# Altium PCB Zulu_a7_no_pmod.PcbDoc (part 4 of 5)
Units mm, origin at the board's own origin, x right, y up, seen from the top; angles counter-clockwise.
Board outline 60.96 x 25.4 mm, 6 copper layers (Top Layer, L2-GND, L3-SIG, L4-SIG, L5-VCC3V3, Bottom Layer), stack 1.65 mm thick; 195 components, 183 nets, 874 pads, 1992 vias.
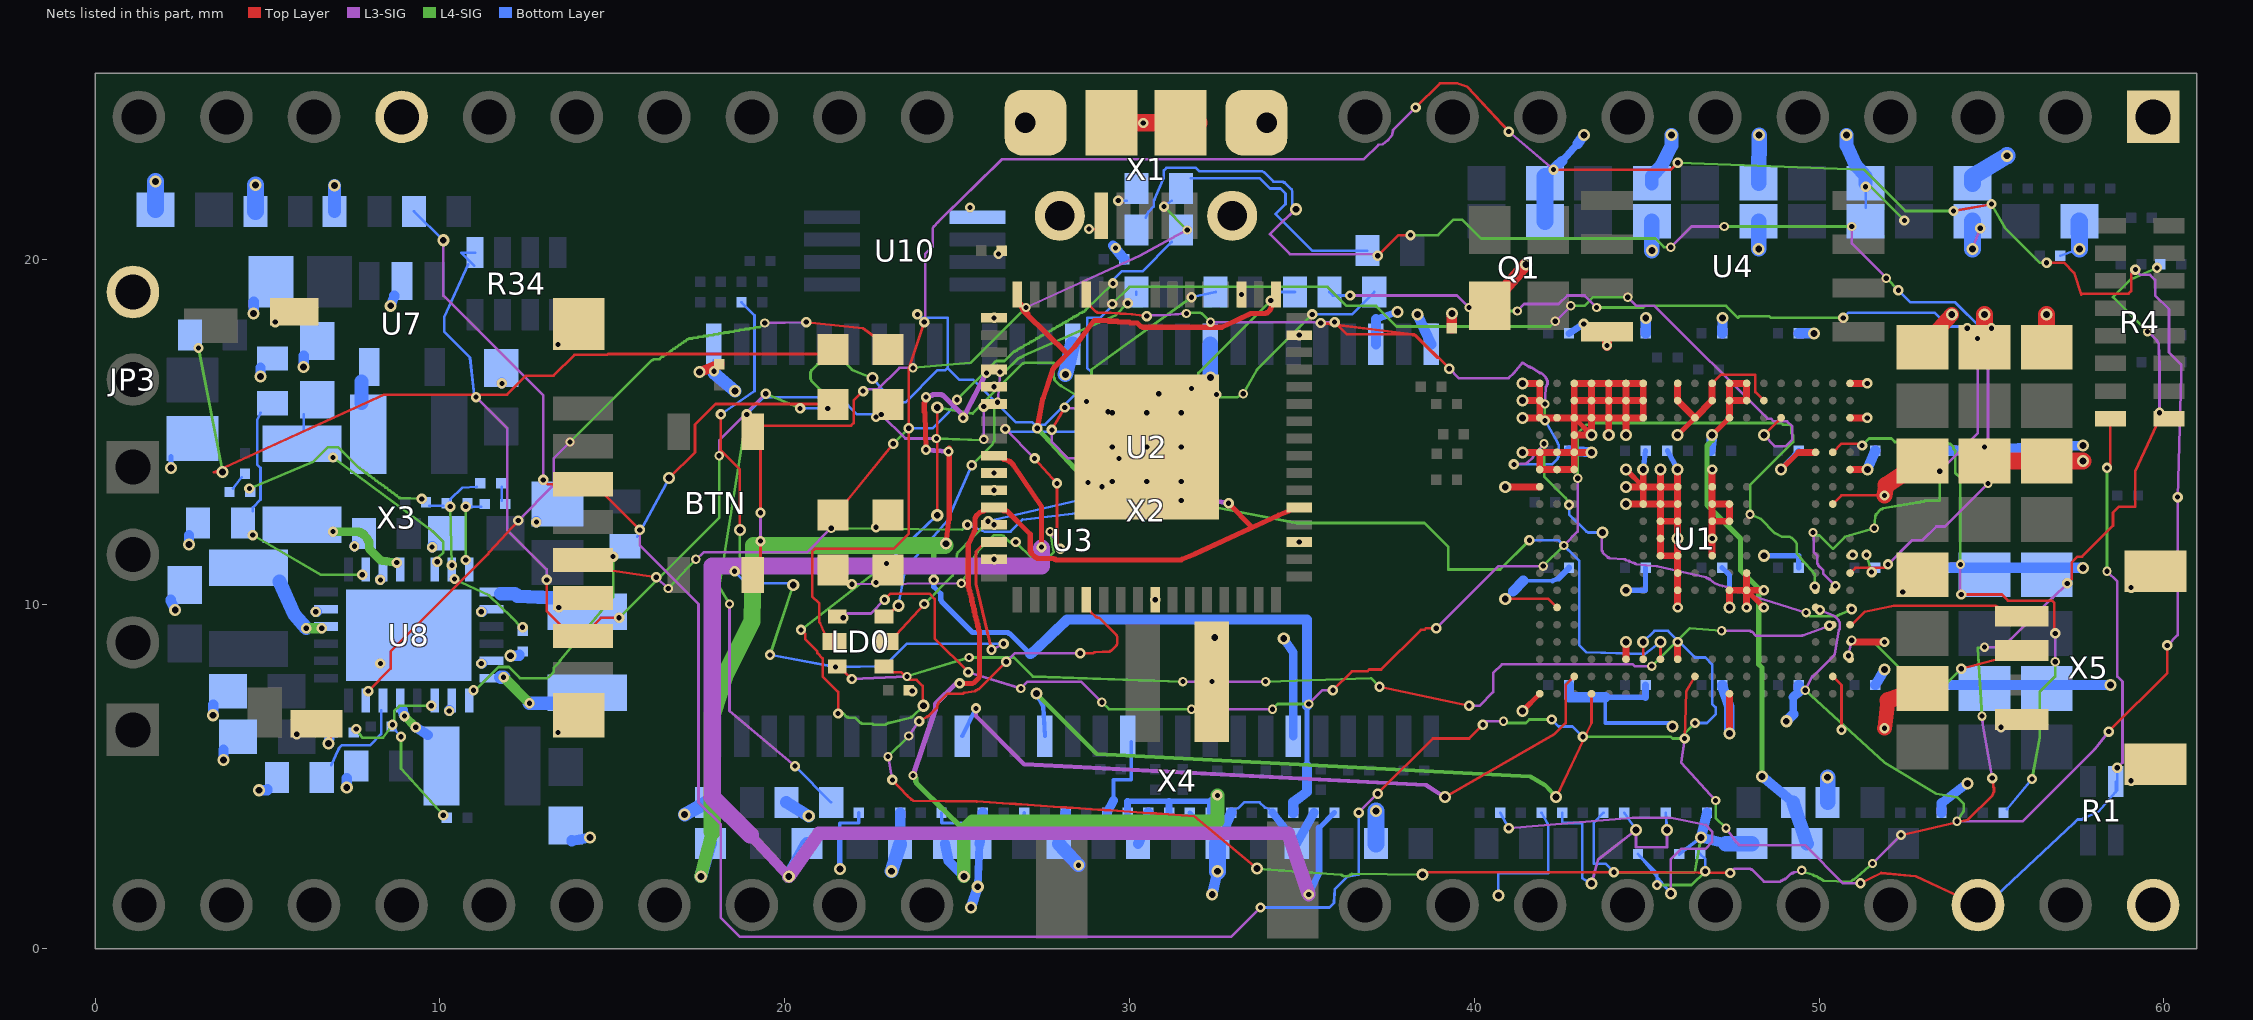
[diagram p7: the nets of this part, all layers, seen from the top]

## Via types
v1: diameter 0.27, hole 0.15, L3-SIG to L4-SIG, tented both sides, 402 vias
v2: diameter 0.3, hole 0.15, Top Layer to L2-GND, tented both sides, 351 vias
v3: diameter 0.3, hole 0.15, L5-VCC3V3 to Bottom Layer, tented both sides, 317 vias
v4: diameter 0.35, hole 0.2, Top Layer to Bottom Layer, tented both sides, 315 vias
v5: diameter 0.3, hole 0.15, L2-GND to L3-SIG, tented both sides, 311 vias
v6: diameter 0.3, hole 0.15, L4-SIG to L5-VCC3V3, tented both sides, 296 vias

## Nets (pads, with @x,y where several pads share a name; then routed paths per layer and width w, separated by ;. In a path a pad name is that pad's centre, name@x,y a point inside that pad or via, vN(x,y) a via of type N, cw(c..) or ccw(c..) an arc to the next point about the centre after c; other vN are vias at no path point) (continued)
FT-PWREN#: U1.P19 U2.60 | length 35
  Top Layer w0.076: U2.60@28.85,18.7 28.875,18.625 29.025,18.475 29.05,18.475 29.075,18.45 29.45,18.45 29.725,18.425 30.075,18.4 30.3,18.375 v2(30.5,18.35) ; v2(35.55,18.15) 38.2,17.825 38.225,17.8 38.25,17.8 38.3,17.775 38.925,17.15 ; v2(35.95,18.175) 36.3,17.825 38.25,17.825 38.275,17.8 38.3,17.8 v2(39.275,16.825)
  L3-SIG w0.076: v2(30.5,18.35) 30.55,18.375 30.975,18.375 v1(31.65,18.425) ; v1(32.35,18.175) v2(35.95,18.175) ; v2(39.275,16.825) 39.55,16.55 41,16.55 41.15,16.7 41.4,17 41.525,16.925 41.55,16.9 41.575,16.9 41.6,16.875 41.625,16.875 41.65,16.85 41.675,16.85 41.875,16.725 41.9,16.7 41.925,16.7 41.975,16.675 42.075,16.575 42.075,16.55 42.1,16.525 42.1,16.5 42.125,16.475 42.125,16.375 42.1,16.35 42.1,16.325 42.075,16.3 42.075,16.275 v1(42.05,15.8) ; v1(41.15,14.05) 41.5,14.075 41.525,14.1 41.55,14.1 41.7,14.25 41.725,14.3 v1(42.025,14.65) ; v4(43.725,12.075) 43.7,12.05 43.7,11.55 43.725,11.525 43.725,11.5 43.875,11.35 43.9,11.35 43.925,11.325 44.35,11.3 44.375,11.3 44.4,11.275 44.475,11.25 44.5,11.25 44.525,11.225 44.6,11.2 44.625,11.2 44.65,11.175 44.675,11.175 44.7,11.15 44.975,11.125 45.3,11.1 46.725,10.775 46.75,10.75 46.775,10.75 46.8,10.725 46.825,10.725 46.975,10.6 47.05,10.575 47.125,10.55 47.2,10.525 47.3,10.5 47.375,10.475 47.45,10.45 47.525,10.425 47.55,10.4 47.575,10.4 47.6,10.375 47.625,10.375 47.65,10.35 47.675,10.35 v1(49.625,9.75)
  L4-SIG w0.076: v1(31.65,18.425) 31.675,18.45 32.05,18.45 32.1,18.425 v1(32.35,18.175) ; v1(42.025,14.65) 42.025,13.7 42.65,13.075 v6(42.75,12.875) ; v6(42.05,15.325) v1(42.05,15.8) ; v1(49.625,9.75) 49.725,9.65 50.525,9.65 50.55,9.675 50.575,9.675 50.6,9.7 50.625,9.7 v2(50.95,9.85)
  Bottom Layer w0.076: v1(41.15,14.05) 42.25,14.05 42.425,14.225 42.425,14.25 42.45,14.275 42.45,14.625 42.425,14.65 42.425,14.675 v6(42.05,15.325) ; v6(42.75,12.875) 42.75,12.6 43.25,12.1 43.275,12.1 43.3,12.075 v4(43.725,12.075)
  other v1: 50.95,9.85
  other v3: 42.75,12.875 41.15,14.05 42.05,15.325
  other v5: 50.95,9.85 39.275,16.825 35.55,18.15 35.95,18.175 30.5,18.35
  other v6: 41.15,14.05
FT-REF: R18.2 U2.6 | length 21.3
  L3-SIG w0.076: v1(18.4,10) 18.4,6.9 v1(20.3,5.3) ; v1(22.8,15.5) 23.5,14.8 v1(24.4,14.8) ; v1(25.775,14.775) v2(25.775,15.725)
  L4-SIG w0.076: v1(18.4,10) 18.1,10.5 v6(18.9,15.5) ; v1(24.4,14.8) 25.775,14.75 v1(25.775,14.775)
  Bottom Layer w0.076: v6(18.9,15.5) 19.4,16 21.6,16 22.1,15.5 v1(22.8,15.5) ; v1(20.3,5.3) R18.2@21.35,4.25
  other v3: 20.3,5.3 18.9,15.5 22.8,15.5
  other v5: 25.775,15.725
  other v6: 20.3,5.3 22.8,15.5
FT-RESETN: R19.1 U2.14 | length 23.6
  Top Layer w0.076: v2(18.15,15.5) 18.15,14.45 18.7,13.9 v4(18.7,12.15) ; v4@20.15,10.6 20.15,10.55 v4(20.25,10.55) ; U2.14@25.775,11.7 25.7,11.675 25.55,11.525 25.55,10.575 v2(26,8.675)
  L3-SIG w0.076: v2(26,8.675) v1(26.35,8.85)
  L4-SIG w0.076: v6(18.55,10.95) 18.7,11.1 v4(18.7,12.15) ; v6(19.575,8.525) v4(20.25,10.55)
  Bottom Layer w0.076: v2(18.15,15.5) 19.125,16.175 19.125,18.375 R19.1@18.75,18.75 ; v6(18.55,10.95) 18.9,10.6 20.15,10.6 v4(20.25,10.55) ; v6(19.575,8.525) v3(21.475,8.175) 22.9,8.2 23.55,8.85 v1(26.35,8.85)
  other v1: 18.15,15.5
  other v3: 19.575,8.525 26.35,8.85 18.55,10.95 18.15,15.5
  other v5: 26,8.675 18.15,15.5
  other v6: 26.35,8.85 18.15,15.5
FT-VCORE: C139.2 C152.2 C153.2 C154.2 U2.12 U2.37 U2.49 U2.64 | length 53.6
  Top Layer w0.15: v2(25.075,7.7) 25.45,7.7 25.5,7.725 25.625,7.85 25.65,7.9 25.65,9.225 25.625,9.25 25.625,9.325 25.6,9.35 25.6,9.425 25.575,9.45 25.575,9.525 25.55,9.55 25.55,9.625 25.525,9.65 25.525,9.75 25.5,9.775 25.5,9.85 25.475,9.875 25.475,9.95 25.45,9.975 25.45,10.05 25.425,10.075 25.425,10.175 25.4,10.2 25.4,10.275 25.375,10.3 25.375,10.375 25.35,10.4 25.35,10.475 25.325,10.5 25.325,11.725 25.5,12.1 25.525,12.125 25.525,12.5 25.55,12.525 25.55,12.55 25.65,12.65 U2.12@25.775,12.7 ; U2.12@26.35,12.7 26.45,12.7 27.125,12.025 27.125,11.525 27.15,11.5 27.15,11.475 27.275,11.35 27.3,11.35 27.325,11.325 27.8,11.325 27.825,11.3 27.85,11.3 27.875,11.275 31.5,11.275 31.525,11.3 31.9,11.45 34.325,12.575 U2.37@34.625,12.7 ; U2.64@26.85,18.7 26.875,18.6 26.95,18.525 26.95,18.5 27,18.45 27.025,18.45 27.05,18.425 ; 26.9,18.55 26.925,18.5 27,18.425 28.2,17.25 ; v1(27.325,15.1) 27.475,15.925 27.475,15.95 27.5,15.975 27.75,16.725 27.775,16.8 27.8,16.825 27.8,16.85 28.4,17.45 28.975,18.225 29.375,18.225 29.4,18.2 29.65,18.2 29.675,18.175 30,18.175 30.025,18.15 30.225,18.15 30.325,18.05 30.35,18.05 30.375,18.025 32.675,18.025 33.525,18.425 33.95,18.425 33.975,18.45 34,18.45 34.075,18.525 U2.49@34.15,18.7 ; v2(32.875,12.925) 33.55,12.225
  L3-SIG w0.15: v1(23.725,5.025) 24.35,6.875 24.35,6.9 24.375,6.925 24.375,7.1 24.975,7.7 v2(25.075,7.7) ; v1(28.8,13.525) v2(32.875,12.925)
  L4-SIG w0.15: v1(23.725,5.025) 23.8,4.95 23.8,4.85 23.825,4.825 23.825,4.8 23.95,4.675 25.2,3.45 ; v1(27.325,15.1) v1(28.8,13.525)
  L4-SIG w0.39: v4(25.2,2.1) 25.2,3.45
  L4-SIG w0.4: 25.2,3.45 25.45,3.7 32.55,3.7 v6(32.55,4.45)
  Bottom Layer w0.16: 29.949,4.28 32.349,4.28
  Bottom Layer w0.2: C152.2@29.949,3.95 29.949,4.28 ; C153.2@31.149,3.95 31.149,4.28 ; C154.2@32.349,3.95 32.349,4.28 v6(32.55,4.45)
  Bottom Layer w0.29: 24.75,2.55 v4(25.2,2.1)
  Bottom Layer w0.3: C139.2@24.65,3.05 24.75,2.55
  other v2: 27.325,15.1
  other v3: 32.55,4.45
  other v5: 25.075,7.7 32.875,12.925 27.325,15.1
FT-VPHY: C40.2 L4.1 U2.4 | length 43.5
  Top Layer w0.15: v2(24.1,14.475) 24.075,15.525 24.075,15.55 24.05,15.575 24.05,15.825 24.075,15.85 24.075,15.875 v2(24.1,16) ; v4(24.675,11.75) 24.75,12.4 24.75,12.425 24.775,12.45 v2@24.775,14.525 ; v2(24.75,14.425) v2@24.775,14.425
  L3-SIG w0.15: v2(24.1,14.475) 24.325,14.45 v2(24.75,14.425) ; v2(24.1,16) 24.25,16.05 24.275,16.05 24.3,16.075 24.55,16.075 24.575,16.05 24.6,16.05 25.175,15.475 v5@25.2,15.475 ; v5(25.175,15.4) v2(25.85,16.7)
  L4-SIG w0.15: v6(24.325,10.7) 24.325,11.7 ; v4@24.65,11.7 24.675,11.725 v4(24.675,11.75)
  L4-SIG w0.37: v4(17.57,2.1) 17.9,3.4
  L4-SIG w0.5: 17.9,3.4 17.9,6.8 18.3,8 19.05,9.5 19.1,11.7 v4@24.65,11.7
  Bottom Layer w0.15: v6(24.325,10.7) 24.325,10.5 24.525,10.3 24.525,10.125 24.55,10.1 24.55,10.075 25.45,9.175 26.475,9.175 26.5,9.15 26.525,9.15 27.125,8.55 ; 35.15,5.3 35.15,7.05
  Bottom Layer w0.3: 27.125,8.55 27.2,8.6 28.2,9.55 35.15,9.55 35.15,7.05 ; C40.2@34.749,3.95 34.749,4.25 35.15,4.55 35.15,5.3
  Bottom Layer w0.37: v4(17.57,2.1) L4.1@17.85,3.05
  other v3: 24.325,10.7
  other v5: 24.75,14.425 24.1,14.475 24.1,16 25.85,16.7
FT-VPLL: C41.2 L5.1 U2.9 | length 43.7
  Top Layer w0.15: U2.9@26.35,14.2 26.5,14.15 26.525,14.125 26.55,14.125 26.625,14.05 26.65,14 27.45,12.825 v2(27.45,11.65)
  L3-SIG w0.15: v5@27.45,11.625 v2(27.45,11.65)
  L3-SIG w0.3: 19,3.3 v4(20.12,2.1)
  L3-SIG w0.39: v4(20.12,2.1) 21,3.35
  L3-SIG w0.4: 21,3.35 34.6,3.35 v1(35.2,1.575)
  L3-SIG w0.5: 19,3.3 17.9,4.4 17.9,7.4 17.9,11.1 27.45,11.1 v5@27.45,11.625
  Bottom Layer w0.15: 35.5,3.5 C41.2@35.949,3.95
  Bottom Layer w0.2: v1(35.2,1.575) 35.5,2.2 35.5,3.5
  Bottom Layer w0.39: v4(20.12,2.1) L5.1@20.65,3.05
  other v3: 35.2,1.575
  other v5: 27.45,11.65
  other v6: 35.2,1.575
GND: C3.1 C4.1 C5.1 C6.1 C7.1 C8.1 C9.1 C11.1 C12.1 C13.1 C38.1 C40.1 C41.1 C78.1 C80.1 C82.1 C84.1 C85.2 C86.2 C87.2 C88.2 C89.2 C90.2 C91.2 C92.2 C93.2 C94.2 C95.2 C96.2 C97.2 C98.2 C99.2 C100.2 C101.2 C102.2 C103.2 C104.2 C105.2 C106.2 C107.2 C108.2 C109.2 C110.2 C111.2 C112.2 C113.2 C114.2 C115.2 C116.2 C117.2 C118.2 C119.2 C120.2 C121.2 C122.2 C133.1 C134.1 C135.1 C136.1 C137.1 C138.1 C139.1 C140.2 C141.2 C142.2 C143.2 C144.2 C145.2 C146.2 C147.1 C148.1 C149.1 C150.1 C151.1 C152.1 C153.1 C154.1 C155.1 C156.1 C157.1 C158.1 C159.1 C160.1 C161.1 C167.1 C168.1 JP3.3 L6.1 LD1.K LD2.K LD3.K Q1.2 R5.1 R11.1 R13.2 R15.1 R17.2 R18.1 R21.1 R22.1 R86.1 R102.2 R103.2 R114.2 R116.2 U1.A1 U1.A3 U1.A4 U1.A5 U1.A6 U1.A7 U1.A9 U1.A11 U1.A19 U1.B1 U1.B3 U1.B4 U1.B5 U1.B6 U1.B7 U1.B9 U1.B11 U1.B14 U1.C1 U1.C2 U1.C3 U1.C4 U1.C5 U1.C6 U1.C7 U1.C10 U1.C19 U1.D3 U1.E1 U1.E2 U1.E3 U1.E17 U1.F1 U1.F2 U1.F3 U1.F19 U1.G1 U1.G7 U1.G8 U1.G9 U1.G11 U1.H7 U1.H8 U1.H9 U1.H11 U1.H12 U1.H18 U1.J8 U1.J9 U1.J11 U1.J12 U1.K8 U1.L8 U1.L9 U1.L11 U1.L19 U1.M9 U1.M13 U1.N9 U1.N12 U1.N13 U1.P2 U1.T19 U1.U6 U1.U9 U1.V18 U1.W1 U1.W12 U2.1 U2.5 U2.10 U2.11 U2.13 U2.15 U2.25 U2.35 U2.47 U2.51 U2.EP U3.6 U3.12 U3.28 U3.41 U3.46 U3.52 U3.54 U4.4 U7.2 U8.3 U8.10 U8.13 U8.16 U8.27 U8.29 U10.5 X1.5 X1.MH1 X1.MH2 X1.MP1 X1.MP2 X1.MP3 X1.MP4 X1.MS1 X1.MS2 X2.1 X2.17 X2.21 X3.6 X3.G1 X3.G2 X3.G3 X3.G4 X4.2 X5.1 X5.MP1 X5.MP2 | length 182.2
  Top Layer w0.076: v2(28.825,20.875) X1.5@29.025,20.875 ; v4(40.9,10.15) 42.15,10.15 U1.P2@42.4,9.9 ; U1.A11@46.9,16.4 47.15,16.65 48.15,16.65 48.15,16.15 U1.B14@48.4,15.9 ; U1.V18@50.4,7.9 50.65,7.65 v2(50.65,6.35) ; U1.H18@50.4,12.9 50.65,13.15 v2(51.9,13.15)
  Top Layer w0.15: v4(6.775,5.95) X3.G2@6.8,6.15 ; v4(41.4,6.9) U1.W1@41.9,7.4 ; U1.C3@42.9,15.4 v4(43.4,14.9) ; v4(44.4,13.9) U1.G7@44.9,13.4 ; v4(45.9,14.9) U1.C10@46.4,15.4 ; U1.N13@47.9,10.4 v2(48.4,9.9) ; v4(48.9,13.9) 49.4,14.4
  Top Layer w0.2: v4(40.9,13.4) U1.G1@41.9,13.4 ; v4(41.4,14.4) U1.E1@41.9,14.4 ; v4(41.4,15.4) U1.C1@41.9,15.4 ; v4(41.4,15.9) U1.B1@41.9,15.9 ; v4(41.4,16.4) U1.A1@41.9,16.4 U1.B1@41.9,15.9 ; v4(43.4,14.4) U1.E3@42.9,14.4 ; v4(43.9,14.9) U1.C5@43.9,15.4 ; U1.U6@44.4,8.4 v4(44.4,8.9) ; v4(44.4,12.9) U1.H7@44.9,12.9 ; v4(44.4,13.4) U1.G7@44.9,13.4 ; v4(44.4,14.9) U1.C6@44.4,15.4 ; v4(44.9,13.9) U1.G7@44.9,13.4 ; v4(45.4,13.9) U1.G8@45.4,13.4 ; U1.U9@45.9,8.4 v2(45.9,8.9) ; v2(45.9,9.9) U1.N9@45.9,10.4 U1.M9@45.9,10.9 U1.L9@45.9,11.4 ; v4(45.9,13.9) U1.G9@45.9,13.4 ; U1.A9@45.9,16.4 U1.B9@45.9,15.9 U1.C10@46.4,15.4 U1.B11@46.9,15.9 U1.A11@46.9,16.4 ; U1.L11@46.9,11.4 v2(46.9,11.9) U1.J11@46.9,12.4 ; v2(46.9,13.9) U1.G11@46.9,13.4 U1.H11@46.9,12.9 ; v4(47.4,6.25) U1.W12@47.4,7.4 ; v4(47.4,9.9) U1.N12@47.4,10.4 U1.N13@47.9,10.4 ; v2(47.9,9.9) U1.N13@47.9,10.4 ; U1.M13@47.9,10.9 U1.N13@47.9,10.4 ; v2(48.4,10.4) U1.N13@47.9,10.4 ; 49.4,14.4 U1.E17@49.9,14.4 ; U1.T19@50.9,8.9 v2(51.9,8.9) ; U1.F19@50.9,13.9 v4(51.4,13.9) ; U1.C19@50.9,15.4 v2(51.4,15.4) ; U1.A19@50.9,16.4 v2(51.4,16.4) ; U1.E1@41.9,14.4 U1.F1@41.9,13.9 U1.F2@42.4,13.9 U1.F3@42.9,13.9 ; U1.E1@41.9,14.4 U1.E2@42.4,14.4 U1.E3@42.9,14.4 ; U1.C1@41.9,15.4 U1.C2@42.4,15.4 U1.C3@42.9,15.4 ; U1.C1@41.9,15.4 U1.B1@41.9,15.9 ; U1.F3@42.9,13.9 U1.E3@42.9,14.4 ; U1.F3@42.9,13.9 U1.E3@42.9,14.4 ; U1.E3@42.9,14.4 U1.D3@42.9,14.9 ; U1.D3@42.9,14.9 U1.C3@42.9,15.4 ; U1.D3@42.9,14.9 v4(43.4,14.9) U1.C4@43.4,15.4 ; U1.C3@42.9,15.4 U1.B3@42.9,15.9 ; U1.C3@42.9,15.4 U1.C4@43.4,15.4 ; U1.B3@42.9,15.9 U1.B4@43.4,15.9 ; U1.B3@42.9,15.9 U1.A3@42.9,16.4 U1.A4@43.4,16.4 ; U1.C4@43.4,15.4 U1.B4@43.4,15.9 ; U1.C4@43.4,15.4 U1.C5@43.9,15.4 ; U1.B4@43.4,15.9 U1.B5@43.9,15.9 ; U1.B4@43.4,15.9 U1.A4@43.4,16.4 ; U1.A4@43.4,16.4 U1.A5@43.9,16.4 ; U1.C5@43.9,15.4 U1.B5@43.9,15.9 ; U1.C5@43.9,15.4 U1.C6@44.4,15.4 ; U1.B5@43.9,15.9 U1.B6@44.4,15.9 ; U1.B5@43.9,15.9 U1.A5@43.9,16.4 ; U1.A5@43.9,16.4 U1.A6@44.4,16.4 ; U1.C6@44.4,15.4 U1.B6@44.4,15.9 ; U1.C6@44.4,15.4 U1.C7@44.9,15.4 ; U1.C6@44.4,15.4 U1.C7@44.9,15.4 ; U1.B6@44.4,15.9 U1.B7@44.9,15.9 ; U1.B6@44.4,15.9 U1.A6@44.4,16.4 ; U1.A6@44.4,16.4 U1.A7@44.9,16.4 U1.B7@44.9,15.9 ; U1.H7@44.9,12.9 U1.H8@45.4,12.9 ; U1.H7@44.9,12.9 U1.G7@44.9,13.4 ; U1.G7@44.9,13.4 U1.G8@45.4,13.4 ; U1.C7@44.9,15.4 U1.B7@44.9,15.9 ; U1.J8@45.4,12.4 U1.K8@45.4,11.9 U1.L8@45.4,11.4 U1.L9@45.9,11.4 ; U1.J8@45.4,12.4 U1.J9@45.9,12.4 ; U1.J8@45.4,12.4 U1.H8@45.4,12.9 ; U1.H8@45.4,12.9 U1.H9@45.9,12.9 ; U1.H8@45.4,12.9 U1.G8@45.4,13.4 ; U1.G8@45.4,13.4 U1.G9@45.9,13.4 ; U1.L9@45.9,11.4 v4(45.9,11.9) U1.J9@45.9,12.4 ; U1.J9@45.9,12.4 U1.H9@45.9,12.9 ; U1.H9@45.9,12.9 U1.G9@45.9,13.4 ; U1.J11@46.9,12.4 U1.J12@47.4,12.4 U1.H12@47.4,12.9 U1.H11@46.9,12.9 ; U1.J11@46.9,12.4 U1.H11@46.9,12.9
  Top Layer w0.3: v4(17.525,16.725) C158.1@18.1,16.95 ; C157.1@39.35,18 v4(39.35,18.425) ; v2@43.85,17.495 U4.4@43.85,17.895
  Top Layer w0.365: Q1.2@40.45,18.65 v4(41.5,19.85)
  Top Layer w0.425: v2(51.9,6.4) 52,7.2
  Top Layer w0.43: C93.2@53,17.449 v4(53.85,18.4)
  Top Layer w0.465: v2(51.9,13.15) 51.95,13.45
  Top Layer w0.5: X1.MP2@29.52,23.958 X1.MP3@32.02,23.958 ; v2(30.4,23.95) v2@30.4,23.958 ; 51.95,13.45 C146.2@53,14.149 ; 52,7.2 C140.2@53,7.55 ; C85.2@54.8,14.149 C86.2@56.6,14.149 v4(57.65,14.149) ; C97.2@54.8,17.449 v4(54.8,18.4) ; C98.2@56.6,17.449 v4(56.6,18.4)
  L3-SIG w0.076: v4(54.45,20.3) v2(54.675,20.9)
  L4-SIG w0.076: v6(44.05,2.22) 46.4,2.22 v4(46.575,3.225) ; v6(51.35,22.1) 51.5,22.1 v1(52.475,21.125) ; v1(51.375,11.425) v6(51.525,10.925)
  Bottom Layer w0.076: C78.1@2.2,14.275 C78.1@2.2,14.3 ; v6(17.95,16.75) U3.28@17.95,17.075 ; U10.5@25.375,21.375 v6(25.375,21.5) ; v5(29.675,21.7) R86.1@29.925,21.7 ; C38.1@33.05,4.05 33.15,4.075 33.325,4.25 33.775,4.25 33.925,4.1 C40.1@34.05,4.05 ; v4(40.7,1.55) 40.7,2.2 42.15,2.2 42.15,3.6 R13.2@41.95,3.95 ; R15.1@43.75,3.95 43.47,3.671 43.47,2.47 43.8,2.47 v6(44.05,2.22) ; C103.2@51.35,21.5 v6(51.35,22.1) ; v6(51.525,10.925) C111.2@51.525,10.95 ; R5.1@57,20.1 v4(57.55,20.3)
  Bottom Layer w0.1: 21.6,3.45 21.6,3.65 22.15,3.65 C133.1@22.15,3.95 ; C135.1@24.55,3.95 24.55,3.65 25.75,3.65 26.95,3.65 C137.1@26.95,3.95 ; C152.1@29.349,3.95 29.35,3.65 30.5,3.65 31.75,3.65 C154.1@31.749,3.95 ; 29.54,4.9 30.05,4.9 U3.12@30.05,6
  Bottom Layer w0.105: R11.1@45.95,2.75 v4(46.575,3.225)
  Bottom Layer w0.11: 41.425,10.675 42.275,10.675 ; 43.8,7.3 43.8,6.55 45.65,6.55 v4(45.75,6.45)
  Bottom Layer w0.115: 29.54,4.3 29.54,4.9
  Bottom Layer w0.13: C154.1@31.749,3.95 C6.1@32.55,3.05 ; v4(40.9,10.15) 41.125,10.375
  Bottom Layer w0.145: 42.275,10.675 42.45,10.75
  Bottom Layer w0.15: v4(2.2,13.95) C78.1@2.2,14.275 ; v4(21.6,2.316) 21.6,3.45 ; v4(44.4,10.4) 44.97,10.4 C90.2@44.97,11.05 ; v4(44.9,13.9) C96.2@44.97,14.45 ; C92.2@45.6,14.45 v4(45.9,13.9) ; C89.2@47.19,11.05 47.4,10.84 v4(47.4,9.9) ; v4(48.4,11.4) 49.41,11.4 C91.2@49.41,11.05 ; v4(48.9,13.9) C95.2@49.41,14.45
  Bottom Layer w0.16: 43.8,7.3 44.97,7.3
  Bottom Layer w0.18: 42.45,10.75 C108.2@42.75,11.05
  Bottom Layer w0.2: C120.2@42.75,17.85 v6(43.175,18.125)
  Bottom Layer w0.205: 37.15,18.26 v4(37.775,18.475)
  Bottom Layer w0.21: 42.55,22.85 43,23.35 ; 44.97,7.3 C109.2@44.97,7.65 ; 49.25,6.8 49.25,7.3
  Bottom Layer w0.23: v4(25.6,1.8) C3.1@25.65,3.05 ; C40.1@34.149,3.95 C7.1@34.85,3.05
  Bottom Layer w0.25: v4(34.475,9) 34.75,8.6 U3.6@34.75,6.17
  Bottom Layer w0.255: C152.1@29.349,3.95 29.54,4.3
  Bottom Layer w0.26: C7.1@34.85,3.05 C41.1@35.349,3.95
  Bottom Layer w0.265: 53.55,4.22 v4(54.3,4.8)
  Bottom Layer w0.28: 49.25,7.3 49.41,7.45
  Bottom Layer w0.29: v4(46.575,3.225) R17.2@46.75,3.95
  Bottom Layer w0.295: v4(46.575,3.225) 47.3,3.05
  Bottom Layer w0.3: C147.1@2.2,10.125 2.2,10.1 v4(2.325,9.825) ; v4(2.725,11.725) 2.725,11.975 R103.2@2.725,12 ; v4(3.425,6.775) 3.425,7.05 C150.1@3.425,7.075 ; v4(3.725,5.475) 3.725,5.75 C151.1@3.725,5.775 ; v4(4.6,18.425) 4.6,18.75 C149.1@4.6,18.775 ; v4(4.75,4.6) 5,4.6 R102.2@5,4.625 ; v4(4.8,16.6) 4.8,16.825 C161.1@4.8,16.85 ; v4(6.05,16.875) 6.05,17.175 C168.1@6.05,17.2 ; v5(6.4,9.775) U8.27@6.425,9.775 ; v4(6.775,5.95) 6.8,6.15 R114.2@6.8,6.175 ; v4(7.3,4.675) 7.3,4.925 C160.1@7.3,4.95 ; v5(7.525,11.675) C167.1@7.525,11.7 ; v5(8.275,10.7) U8.3@8.275,10.725 ; v4(8.575,18.65) 8.675,18.925 U7.2@8.675,18.95 ; v5(9.775,11.65) C148.1@9.775,11.675 ; v5(10.275,6.9) U8.16@10.275,6.925 ; v5(11.2,8.275) U8.13@11.225,8.275 ; v5(11.2,9.775) U8.10@11.225,9.775 ; v5(11.8,16.4) C84.1@11.8,16.425 ; v4(12.05,8.5) 12.3,8.5 R116.2@12.3,8.525 ; v5(12.8,12.375) C80.1@12.8,12.4 ; C82.1@13.825,3.15 13.825,3.125 v4(14.35,3.225) ; C139.1@23.35,3.05 C134.1@23.35,3.95 ; v4(25.4,1.2) v4(25.6,1.8) ; C3.1@25.65,3.05 25.75,3.65 C136.1@25.75,3.95 ; C4.1@27.95,3.05 C138.1@28.15,3.95 ; v3@29.525,20.4 C156.1@29.85,20 ; v3@29.592,20.318 v5(29.6,20.325) ; C5.1@30.25,3.05 30.5,3.65 C153.1@30.549,3.95 ; v4(32.4,1.575) v4(32.55,2.25) ; C6.1@32.55,3.05 C38.1@32.949,3.95 ; U3.52@37.15,17.53 37.15,18.26 ; v4(38.35,18.4) U3.54@38.75,17.53 ; 41.125,10.375 41.425,10.675 ; C106.2@42.05,22.2 42.05,22.4 42.55,22.85 ; C113.2@42.75,7.65 42.75,7.3 43.8,7.3 ; C112.2@42.75,14.45 v4(43.4,14.4) ; 43,23.35 v4(43.18,23.6) ; C117.2@44.97,17.85 v4(44.975,18.3) ; C107.2@47.19,7.65 47.4,7 v4(47.4,6.25) ; C116.2@47.19,17.85 v4(47.2,18.3) ; v4(49.05,6.6) 49.25,6.8 ; 49.41,7.45 C110.2@49.41,7.65 ; C118.2@49.41,17.85 v4(49.85,17.85) ; v4(51.4,13.9) C114.2@51.63,14.45 ; C115.2@51.63,7.65 v4(51.9,8.1) ; R22.1@53.55,3.95 53.55,4.22 ; C122.2@53.85,7.65 v4(58.45,7.65) ; C119.2@53.85,11.05 v4(57.65,11.05) ; C121.2@53.85,14.45 v4(57.65,14.6)
  Bottom Layer w0.36: R18.1@20.05,4.25 v4(20.7,3.85)
  Bottom Layer w0.37: v3@17.95,16.7 v4(18.56,16.18)
  Bottom Layer w0.38: C12.1@6.95,21.39 v4(6.95,22.14)
  Bottom Layer w0.4: v4(17.1,3.9) C9.1@17.75,4.25 ; v4(23.1,2.25) C139.1@23.35,3.05 ; C4.1@27.95,3.05 v3@28.52,2.43 ; C87.2@45.15,22.2 45.15,22.4 45.45,22.75 45.72,23.3 v4(45.72,23.6) ; v4(50.8,23.6) 50.8,23.3 51.05,22.75 51.349,22.4 C94.2@51.349,22.2
  Bottom Layer w0.45: v4(28.14,16.66) U3.41@28.35,17.53 ; v4(32.35,16.575) U3.46@32.35,17.53 ; v4(45.15,20.25) C101.2@45.15,21.1 ; 47.3,3.05 L6.1@48.05,3.05 ; v4(48.25,20.3) C102.2@48.249,21.1 ; C88.2@48.249,22.2 48.249,22.4 v4(48.26,23.6) ; R21.1@50.25,4.25 v4(50.25,4.975)
  Bottom Layer w0.5: C13.1@1.75,21.44 v4(1.75,22.25) ; C11.1@4.65,21.39 v4(4.65,22.15) ; v4(32.55,2.25) C6.1@32.55,3.05 ; C8.1@37.15,3.05 v4(37.15,4) ; C100.2@42.05,21.1 C106.2@42.05,22.4 ; C104.2@54.449,21.1 v4(54.45,20.3) ; C99.2@54.449,22.2 54.449,22.4 v4(55.45,23) ; C105.2@57.549,21.1 v4(57.55,20.3)
  other v1: 28.525,2.425 10.275,6.9 8.275,8.275 11.2,8.275 6.4,9.775 11.2,9.775 8.275,10.7 9.775,11.65 7.525,11.675 12.8,12.375 11.8,16.4 17.95,16.75 43.175,18.125 29.6,20.325 25.375,21.5 29.675,21.7
  other v2: 59.05,4.875 5.85,6.225 13.425,6.275 55.275,6.425 23.7,7.475 32.39,7.75 8.275,8.275 13.45,9.9 30.75,10.125 52.425,10.35 59.05,10.475 22.65,10.625 26.075,11.3 50.975,11.425 51.375,11.425 34.925,11.8 22.65,12.225 26.075,12.3 26.075,13.3 29.5,13.55 30.5,13.55 31.5,13.55 26.075,13.8 29.5,14.55 30.5,14.55 31.5,14.55 22.65,15.425 29.5,15.55 30.5,15.55 31.5,15.55 26.075,16.3 17.95,16.75 43.85,17.5 13.425,17.525 34.925,17.8 43.175,18.125 5.225,18.175 26.075,18.3 33.25,18.975 26.2,20.15 52.475,21.125 25.375,21.5
  other v3: 44.05,2.22 28.525,2.425 10.275,6.9 8.275,8.275 11.2,8.275 6.4,9.775 11.2,9.775 8.275,10.7 51.525,10.925 9.775,11.65 7.525,11.675 12.8,12.375 11.8,16.4 17.95,16.75 43.175,18.125 29.6,20.325 25.375,21.5 29.675,21.7 51.35,22.1
  other v4: 32.475,9.025
  other v5: 28.525,2.425 8.275,8.275 51.375,11.425 17.95,16.75 43.175,18.125 54.675,20.9 52.475,21.125 25.375,21.5
  other v6: 28.525,2.425 10.275,6.9 8.275,8.275 11.2,8.275 6.4,9.775 11.2,9.775 8.275,10.7 9.775,11.65 7.525,11.675 12.8,12.375 11.8,16.4 29.6,20.325 29.675,21.7
GNDADC: C123.2 C124.2 L6.2 U1.A12 U1.A13 U1.B12 U1.B13 U1.C12 | length 16.7
  Top Layer w0.15: v4(46.9,14.9) U1.C12@47.4,15.4
  Top Layer w0.2: U1.C12@47.4,15.4 U1.B12@47.4,15.9 ; U1.B12@47.4,15.9 U1.B13@47.9,15.9 U1.A13@47.9,16.4 U1.A12@47.4,16.4 U1.B12@47.4,15.9
  L4-SIG w0.15: v4(46.9,14.9) 46.9,14.75 46.75,14.6 46.75,12.87 47.72,11.9 47.72,10.98 48.25,10.45 48.25,8.25 48.35,8.15 v4(48.35,5)
  Bottom Layer w0.285: v4(48.35,5) C124.2@49.25,4.25
  Bottom Layer w0.3: C123.2@46.85,14.45 v4(46.9,14.9)
  Bottom Layer w0.4: C124.2@49.25,4.25 L6.2@49.65,3.05
I2C-SCL: U1.R19 X5.4 | length 4.5
  Top Layer w0.076: U1.R19@50.975,9.425 51.325,9.775 52.175,9.95 55.125,9.95 X5.4@55.275,9.875
I2C-SDA: U1.U19 X5.3 | length 5.7
  Top Layer w0.076: v2(50.85,8.5) U1.U19@50.875,8.475 ; v1(54.125,8.125) X5.3@55.275,8.425
  L3-SIG w0.076: v2(50.85,8.5) v1(50.95,8.95)
  L4-SIG w0.076: v1(50.95,8.95) 51.525,8.95 52.4,8.075 52.4,7.85 52.55,7.7 53.7,7.7 v1(54.125,8.125)
  other v2: 54.125,8.125
  other v5: 54.125,8.125 50.85,8.5
LD4_A: LD4.A R108.2 | length 22.5
  Top Layer w0.076: v4(3.7,13.825) 3.45,13.825 8.375,16.075 11.95,16.075 12.5,16.625 13.3,16.625 13.9,17.225 14.85,17.225 14.875,17.25 LD4.A@21.05,17.25
  L4-SIG w0.076: v6(3,17.425) v4(3.7,13.825)
  Bottom Layer w0.076: v6(3,17.425) R108.2@3,17.45
  other v3: 3,17.425
LDQM: U1.W4 U3.15 | length 20.6
  Top Layer w0.076: v4(42.375,4.4) 43.4,6.55 U1.W4@43.4,7.4
  L4-SIG w0.125: v4(27.3,7.4) 29.05,5.65 41.625,5 42.05,4.75 v4(42.375,4.4)
  Bottom Layer w0.125: v4(27.3,7.4) 27.5,7.025 U3.15@27.55,6.17
LED0_B: LD0.2 U1.N17 | length 41.3
  Top Layer w0.076: v2(22.9,10.125) 23.075,10.3 24.2,10.3 24.35,10.15 24.35,9 v2(25.325,8.025) ; v2(35.9,7.5) 36.45,8.05 36.9,8.05 36.95,8.1 37.3,8.1 38.45,9.25 38.55,9.25 38.6,9.3 v2(38.9,9.3) ; U1.N17@49.875,10.475 v2(49.875,10.5)
  L3-SIG w0.076: v2(21.7,9.6) 21.825,9.725 22.5,9.725 v2(22.9,10.125) ; v2(25.325,8.025) v1(26.85,7.55) 27.05,7.75 28.6,7.75 v1(29.2,7.15) ; v1(31.8,6.95) v1(34.15,6.95) ; v1(35.2,7.1) 35.6,7.5 v2(35.9,7.5) ; v2(38.9,9.3) 40.7,11.1 v1(42,11.1) ; v1(42.6,11.7) 43,12.1 v1(43,13.65)
  L4-SIG w0.076: v1(29.2,7.15) 29.4,6.95 v1(31.8,6.95) ; v1(34.15,6.95) 34.3,7.1 v1(35.2,7.1) ; v1(42,11.1) v1(42.6,11.7) ; v1(43,13.65) 43,14.95 43.25,15.2 43.35,15.2 43.4,15.25 48.9,15.25 48.95,15.2 49.15,15.2 49.2,15.15 49.2,14.95 49.25,14.9 49.25,14.7 48,13.45 v1(48,12.6) 48.3,12.475 48.725,12.05 48.925,11.95 49.15,11.95 49.2,11.925 49.325,11.8 49.35,11.75 49.35,11.475 49.425,11.4 49.45,11.35 49.875,10.875 v2(49.875,10.5)
  other v1: 49.875,10.5
  other v5: 35.9,7.5 25.325,8.025 38.9,9.3 21.7,9.6 22.9,10.125 49.875,10.5
LED0_G: LD0.6 U1.R18 | length 30.6
  Top Layer w0.076: LD0.6@21.725,8.05 v2(21.95,7.825) ; v2(37.25,7.6) v2(39.85,7.05) ; v2(50.3,9.375) U1.R18@50.325,9.375
  L3-SIG w0.076: v2(21.95,7.825) v1(23.55,7.9) ; v1(31.55,7.75) v1(33.95,7.75) ; v2(39.85,7.05) 40.15,7.05 40.55,7.45 40.55,8 40.8,8.25 44.6,8.25 44.65,8.2 v1(45.15,8.2) ; v1(47.175,9.225) 48,9.225 48.025,9.2 48.05,9.2 48.175,9.075 49.5,9.075 49.525,9.1 49.55,9.1 v2(50.3,9.375)
  L4-SIG w0.076: v1(23.55,7.9) v1(25.35,8.45) 26.65,8.45 27.2,7.9 v1(31.55,7.75) ; v1(33.95,7.75) 37,7.85 v2(37.25,7.6) ; v1(45.15,8.2) 46.25,9.3 v1(47.175,9.225)
  other v1: 37.25,7.6
  other v5: 39.85,7.05 37.25,7.6 21.95,7.825 50.3,9.375
LED0_R: LD0.4 U1.P17 | length 84.7
  Top Layer w0.076: LD0.4@21.175,9.1 21.025,9.45 21,9.475 21,10.025 20.8,10.225 20.8,11.525 20.875,11.6 23.15,11.6 23.6,12.05 23.6,16.825 v2(24.05,18.175) ; v2(38.3,24.4) 39,25.1 39.5,25.1 39.8,25 v2(41,23.7) ; v2(42.3,22.6) 45.7,22.6 v2(45.9,22.8) ; U1.P17@49.975,9.875 v2(50.025,9.825) ; v2(53.9,21.4) v2(55,21.6) ; v2(56.6,19.9) 57.1,19.9 57.4,19.6 57.6,18.975 57.65,19 58.975,19 59.05,19.075 59.05,19.575 v2(59.175,19.7) ; v2(58.4,6.3) 60.1,8 v2(60.1,8.8)
  L3-SIG w0.076: v2(24.05,18.175) 24.075,18.2 24.075,20.15 24.3,20.375 24.3,20.9 24.325,20.95 24.45,21.075 26.3,22.9 36.8,22.9 37.218,23.318 37.347,23.333 37.502,23.458 37.627,23.613 37.642,23.742 v2(38.3,24.4) ; v2(41,23.7) v2(42.3,22.6) ; v1(49.6,7.5) 49.8,7.9 49.825,7.9 50.425,8.5 50.45,8.55 50.575,9.225 50.575,9.25 50.6,9.275 50.6,9.475 50.575,9.5 50.575,9.525 50.45,9.65 50.4,9.675 v2(50.025,9.825) ; v1(54,3.7) 55.9,3.7 58,5.8 v2(58.4,6.3) ; v2(59.175,19.7) 59.325,19.55 59.6,19.55 59.75,19.4 59.75,18.95 60.15,18.55 60.15,17.3 60.5,16.95 60.5,16.65 v5(60.4,13.1) 60.4,10.2 60.4,9.1 v2(60.1,8.8)
  L4-SIG w0.076: v2(45.9,22.8) 51.3,22.6 52.5,21.4 v2(53.9,21.4) ; v1(49.6,7.5) 51.9,5.4 53.4,4.5 54,4.4 54.2,4.2 54.2,4 v1(54,3.7) ; v2(55,21.6) 55.4,20.9 56.4,19.9 v2(56.6,19.9)
  other v1: 56.6,19.9 53.9,21.4 55,21.6 45.9,22.8
  other v5: 58.4,6.3 60.1,8.8 50.025,9.825 24.05,18.175 59.175,19.7 56.6,19.9 53.9,21.4 55,21.6 42.3,22.6 45.9,22.8 41,23.7 38.3,24.4
LED1: R83.1 U1.N18 | length 31.5
  Top Layer w0.076: U1.N18@50.425,10.475 v2(50.475,10.525)
  L3-SIG w0.076: v1(36.4,18.95) 39.5,18.95 v1(39.85,18.6) ; v1(41.25,18.5) 41.45,18.7 42.45,18.7 42.7,18.95 43.2,18.95 v1(43.55,18.6) ; v1(49.825,12.075) 49.85,12.05 49.85,11.5 49.95,11.4 49.95,11.175 49.975,11.15 49.975,11.125 50.125,10.975 50.125,10.875 v2(50.475,10.525) ; v1(53.5,13.85) 54.6,14.95 v1(54.6,17.7)
  L4-SIG w0.076: v1(39.85,18.6) 39.95,18.5 v1(41.25,18.5) ; v1(43.55,18.6) 44.9,18.6 44.95,18.65 47.3,18.65 47.65,18.3 47.7,18.35 48.55,18.35 48.6,18.3 v6(50.7,18.3) ; v1(49.825,12.075) 49.9,12 50,12 50.4,11.6 50.75,11.95 v1(51.6,12.2) 51.625,12.55 51.65,12.575 51.65,12.6 51.8,12.75 51.825,12.75 51.85,12.775 53.025,12.975 53.05,12.975 53.075,13 53.5,13 v1(53.5,13.85) ; v6(54.3,18) v1(54.6,17.7)
  Bottom Layer w0.076: R83.1@35.8,19.05 35.9,18.95 v1(36.4,18.95) ; v6(50.7,18.3) 50.85,18.45 53.35,18.45 53.7,18.1 53.75,18.1 53.8,18.05 54.25,18.05 v6(54.3,18)
  other v3: 54.3,18 50.7,18.3 36.4,18.95
  other v5: 50.475,10.525
  other v6: 36.4,18.95
LED2: R84.1 U1.M19 | length 40.6
  Top Layer w0.076: v2(37.2,20.1) 37.8,20.7 v2(38.15,20.7) ; U1.M19@50.9,10.9 51.05,11.05 52,11.05 v2(52,11.15)
  L3-SIG w0.076: v4(34.825,21.45) 34.425,21.075 34.075,20.725 34.65,20.15 37.15,20.15 v2(37.2,20.1) ; v1(45.7,20.35) 46.3,20.95 v1(47.25,20.95) ; v1(50.95,20.95) 50.95,20.45 v1(51.95,19.45) ; v2(52,11.15) 52.7,11.85 53,11.85 53.4,12.25 53.65,12.25 v1(54.9,13.5) ; v1(54.8,14.55) 54.9,14.65 54.9,17.75 55,17.85 v1(55,18)
  L4-SIG w0.076: v2(38.15,20.7) 38.95,20.7 39.4,21.15 39.65,21.15 40.2,20.6 45.25,20.6 45.5,20.35 v1(45.7,20.35) ; v1(47.25,20.95) v1(50.95,20.95) ; v1(51.95,19.45) v6(52.3,19.1) ; v1(54.8,14.55) 54.8,13.6 v1(54.9,13.5)
  Bottom Layer w0.076: R84.1@30.475,21.2 30.55,21.375 30.7,21.525 30.7,21.7 30.725,21.725 30.975,22.325 31,22.35 31,22.575 31.075,22.65 31.925,22.65 32.025,22.55 33.85,22.55 33.9,22.525 34.175,22.25 34.45,22.25 34.475,22.225 34.5,22.225 34.7,22.025 34.725,21.975 34.725,21.55 v4(34.825,21.45) ; v6(52.3,19.1) 52.65,18.75 53.95,18.75 54.7,18 v1(55,18)
  other v1: 38.15,20.7
  other v3: 55,18 52.3,19.1
  other v5: 52,11.15 37.2,20.1 38.15,20.7
  other v6: 55,18
N$BTN: BTN.3 BTN.4 R85.1 R86.2 | length 25.9
  Top Layer w0.076: BTN.3@19.3,11.25 v2(19.3,11.825) ; v2(19.3,12.65) BTN.4@19.3,14.575 ; BTN.4@19.325,15.175 21.925,15.175 22,15.25 22,15.9 v2(22.275,16.175)
  L3-SIG w0.076: v2(19.3,11.825) v2(19.3,12.65) ; v2(22.275,16.175) 22.325,16.225 22.7,16.225 23.325,16.85 v1(23.725,16.85) ; v1(27,18.6) 30.3,20.1 v1(31.675,20.85)
  L4-SIG w0.076: v1(23.725,16.85) 25.4,17 v1(27,18.6) ; v6(31,21.525) v1(31.675,20.85)
  Bottom Layer w0.076: v6(31,21.525) R86.2@31.225,21.7 ; R86.2@31.775,22.35 33.775,22.35 34.075,22.05 34.375,22.05 34.525,21.9 34.525,21.6 34.25,21.325 ; 34.25,21.3 34.25,21.325 ; R85.1@36.9,20.25 35.3,20.25 34.238,21.312 34.25,21.325
  other v3: 31,21.525
  other v5: 19.3,11.825 19.3,12.65 22.275,16.175
N$LD0B: LD0.1 R80.2 | length 12.4
  Top Layer w0.076: LD0.1@23.075,9.775 v4(23.3,9.95)
  L3-SIG w0.076: v1(26.175,15.85) v1(26.25,16.725)
  L4-SIG w0.076: v6(25.425,14.025) 26.025,14.625 26.05,14.675 26.05,14.7 26.075,14.725 26.075,15.75 v1(26.175,15.85) ; v1(26.25,16.725) 26.375,16.725 26.775,17.125 26.8,17.125 26.825,17.15 26.85,17.15 26.875,17.175 26.9,17.175 26.925,17.2 29.6,18.375 v6(29.95,18.725)
  Bottom Layer w0.076: v4(23.3,9.95) 23.5,11 23.525,11.025 23.525,11.05 24.725,12.425 24.725,12.45 24.75,12.475 v6(25.425,14.025) ; R80.2@30.2,18.975 R80.2@30.2,19.05
  other v3: 25.425,14.025 29.95,18.725
N$LD0G: LD0.5 R82.2 | length 29.2
  Top Layer w0.076: v1(20.475,9.25) 20.6,9.125 20.6,8.975 20.95,8.625 20.95,8.575 21.1,8.425 21.1,7.9 21.55,7.45 v2(21.55,6.825) ; LD0.5@23.075,8.05 23.1,8.025 23.375,8.025 23.6,7.8 23.825,7.8 24,7.625 24,7.075 v4(24.025,7.05) ; v4(24.425,12.575) v4(24.425,15.7)
  L3-SIG w0.076: v1@30.825,16.075 v5(30.85,16.1)
  L4-SIG w0.076: v1(20.475,9.25) v6(22.95,11.175) ; v2(21.55,6.825) 21.7,6.825 21.8,6.725 21.825,6.725 21.85,6.7 22.05,6.7 22.2,6.55 22.225,6.55 22.25,6.525 22.55,6.525 22.575,6.5 22.925,6.5 22.95,6.525 22.975,6.525 23,6.55 23.025,6.55 23.65,6.7 23.675,6.725 23.7,6.725 v4(24.025,7.05) ; v4(24.425,15.7) 25.45,15.525 26.9,16.975 26.925,16.975 26.95,17 27.8,17 27.8,16.575 27.825,16.55 27.825,16.5 27.975,16.35 28,16.35 28.025,16.325 v6(28.75,15.875) ; v6(31.8,16.25) 32,16.45 32,16.7 v6(34.1,18.8)
  Bottom Layer w0.076: v6(22.95,11.175) v4(24.425,12.575) ; v6(28.75,15.875) 29.225,15.4 29.375,15.4 29.4,15.425 29.425,15.425 29.975,15.975 v5(30.85,16.1) 31,16.25 v6(31.8,16.25) ; v6(34.1,18.8) 34.35,19.05 R82.2@34.8,19.05
  other v1: 21.55,6.825 30.85,16.1
  other v2: 20.475,9.25
  other v3: 22.95,11.175 28.75,15.875 30.85,16.1 31.8,16.25 34.1,18.8
  other v5: 21.55,6.825 20.475,9.25
  other v6: 30.85,16.1
N$LD0R: LD0.3 R81.2 | length 19.4
  Top Layer w0.076: LD0.3@23.225,9.1 v1(24.05,10) ; v2(27.75,15.05) v2(28.125,15.7)
  L3-SIG w0.076: v2(27.75,15.05) 27.75,14.7 28.225,14.225 v1(29.7,14.225) ; v2(28.125,15.7) v1(29.375,15.575)
  L4-SIG w0.076: v1(24.05,10) 24.875,10.825 25,11.45 25.025,11.5 v6(25.9,12.4) ; v6(29.2,13.4) 29.85,14.05 v1(29.7,14.225) ; v1(29.375,15.575) 29.6,15.8 28.9,16.5 28.9,16.8 v6(31.8,18.9)
  Bottom Layer w0.076: v6(25.9,12.4) 28.9,13.1 v6(29.2,13.4) ; v6(31.8,18.9) R81.2@32.5,19.05
  other v2: 24.05,10
  other v3: 25.9,12.4 29.2,13.4 31.8,18.9
  other v5: 24.05,10 27.75,15.05 28.125,15.7
N$LD1A: LD1.A R83.2 | length 25
  Top Layer w0.076: LD1.A@21.75,10.625 v2(21.95,10.575) ; v2(27.25,14.225) v2(27.9,13.5) 27.9,11.7 v2(28,11.6)
  L3-SIG w0.076: v2(21.95,10.575) v1(25.125,10.6) ; v6(26.4,15.075) v2(27.25,14.225) ; v1(27.7,12.1) v2(28,11.6)
  L4-SIG w0.076: v1(25.125,10.6) 25.375,11 25.425,11.225 25.425,11.25 25.475,11.3 25.5,11.35 25.5,11.375 25.55,11.425 25.55,11.45 25.6,11.5 25.6,11.525 26.075,12 26.3,12 26.35,11.975 26.525,11.8 v6(26.7,11.8) 27.2,11.3 27.6,11.3 27.8,11.5 v1(27.7,12.1) ; v6(32.525,16.075) 32.6,16 33.125,16 v1(33.3,16.1) 33.7,16.8 v6(35.3,18.4)
  Bottom Layer w0.076: v6(26.4,15.075) 26.475,15 31.175,15 v6(32.525,16.075) ; v6(35.3,18.4) 36.45,18.4 R83.2@37.1,19.05
  other v1: 26.4,15.075
  other v3: 26.4,15.075 32.525,16.075 35.3,18.4
  other v5: 21.95,10.575 28,11.6 27.25,14.225
N$LD2A: LD2.A R84.2 | length 12.8
  Top Layer w0.076: LD2.A@21.75,12.925 v1(23.15,14.65)
  L4-SIG w0.076: v1(23.15,14.65) v6(23.6,15.1) ; v6(25,15.925) 26.1,17.025 26.15,17.05 26.375,17.05 26.65,17.325 26.675,17.325 26.7,17.35 26.725,17.35 26.775,17.4 26.8,17.4 26.825,17.425 26.85,17.425 26.875,17.45 26.9,17.45 26.95,17.5 27,17.525 27.05,17.55 27.075,17.55 27.125,17.6 27.15,17.6 27.175,17.625 27.2,17.625 27.225,17.65 27.25,17.65 27.3,17.7 27.325,17.7 27.35,17.725 27.375,17.725 27.425,17.775 27.45,17.775 27.475,17.8 27.5,17.8 27.525,17.825 27.55,17.825 27.6,17.875 27.65,17.9 27.675,17.9 27.7,17.925 27.725,17.925 27.775,17.975 27.8,17.975 27.825,18 27.85,18 27.9,18.05 27.925,18.05 27.95,18.075 27.975,18.075 28,18.1 28.025,18.1 28.075,18.15 28.1,18.15 28.125,18.175 28.15,18.175 28.175,18.2 28.2,18.2 28.25,18.25 28.3,18.275 28.325,18.275 28.375,18.325 28.4,18.325 28.425,18.35 28.45,18.35 28.475,18.375 28.5,18.375 28.55,18.425 28.6,18.45 28.625,18.45 28.65,18.475 28.675,18.475 28.725,18.525 v6(29.525,19.3)
  Bottom Layer w0.076: v6(23.6,15.1) 24.3,15.1 24.75,15.55 v6(25,15.925) ; v6(29.525,19.3) 29.525,19.4 29.775,19.65 30.375,19.65 R84.2@31.225,20.5
  other v2: 23.15,14.65
  other v3: 23.6,15.1 25,15.925 29.525,19.3
  other v5: 23.15,14.65
NetL3_1: L3.1 U7.5 | length 0.6
  Bottom Layer w0.4: L3.1@7.725,15.825 U7.5@7.725,16.45
NODE_P0: R10.1 R11.2 R12.2 | length 14
  L3-SIG w0.076: v1(41,3.5) 44.6,3.8 45.7,3.8 46.7,3.6 46.9,3.4 46.9,3.1 46.7,2.9 46,2.9 45.7,2.6 v4(45.7,1.6)
  L4-SIG w0.076: v6(45.3,1.85) 46.3,1.85 v6(46.7,2.25)
  Bottom Layer w0.076: R12.2@40.75,3.95 v1(41,3.5) ; v6(45.3,1.85) 45.3,2.2 R10.1@44.75,2.75 v4(45.7,1.6) ; R11.2@46.55,2.75 46.7,2.6 v6(46.7,2.25)
  other v3: 45.3,1.85 46.7,2.25 41,3.5
  other v6: 41,3.5
NODE_P1: R14.1 R15.2 R16.2 | length 7.9
  L3-SIG w0.076: v4(43.4,1.89) 43.6,2.6 v4(44.69,3.45) 44.69,2.95 45.59,2.95 v4(45.59,3.45)
  Bottom Layer w0.076: R14.1@42.55,3.95 42.55,3.65 43.13,3.65 43.13,2.05 v4(43.4,1.89) ; R15.2@44.35,3.95 v4(44.69,3.45) ; R16.2@45.55,3.95 v4(45.59,3.45)
PROG#: R4.1 R99.1 U2.21 | length 63.3
  Top Layer w0.076: v2(23.125,4.9) 23.55,4.45 23.675,4.325 23.7,4.325 23.725,4.3 25.575,4.275 25.95,4.25 26.325,4.225 26.7,4.2 27.05,4.175 27.425,4.15 27.8,4.125 28.175,4.1 28.55,4.075 28.9,4.05 29.275,4.025 29.65,4 30.025,3.975 30.4,3.95 30.775,3.925 31.125,3.9 31.5,3.875 31.875,3.85 v4(33.7,2.325) ; v2(23.9,6.6) 24.125,6.725 24.15,6.75 24.175,6.75 24.425,7 24.425,7.075 24.45,7.1 24.45,7.125 24.725,7.4 25.175,7.4 25.2,7.425 25.225,7.425 25.525,7.475 25.55,7.5 25.575,7.5 25.6,7.525 25.625,7.525 v2(26.425,8.325) ; v2(28.575,8.575) 28.95,8.575 28.975,8.6 29,8.6 29.425,8.625 29.45,8.65 29.475,8.65 29.625,8.8 29.65,8.85 29.65,9.05 29.625,9.1 29.125,9.6 29.075,9.6 29.05,9.625 29.025,9.625 28.875,9.775 U2.21@28.85,9.825 ; v4(38.5,2.15) 38.575,2.225 45.55,2.225 v2(47.425,2.2) ; v2(52.375,3.3) 54.325,3.75 55.025,4.45 55.05,4.5 55.05,4.525 55.075,4.55 55.075,4.675 55.05,4.7 55.05,4.75 v2(55.025,4.95) ; v2(57.2,10.6) 57.325,10.725 57.325,11.2 57.5,11.375 57.625,11.375 58.525,12.275 58.525,12.65 58.7,12.825 59.175,12.825 59.175,13.85 R4.1@59.8,15.2
  L3-SIG w0.076: v1(23,5.575) v2(23.125,4.9) ; v1(23.6,6.175) v2(23.9,6.6) ; v2(26.425,8.325) 26.675,8.575 v2(28.575,8.575) ; v2(47.425,2.2) 47.55,2.325 48,2.325 48.025,2.3 48.05,2.3 48.4,1.95 48.875,1.95 48.9,1.975 48.925,1.975 48.95,2 48.975,2 49,2.025 49.025,2.025 49.175,2.175 49.2,2.175 49.225,2.2 49.25,2.2 49.275,2.225 49.3,2.225 49.475,2.25 v1(49.5,2.275) ; v1(51.55,2.475) v2(52.375,3.3) ; v1(54.725,6.75) 54.75,6.5 v2(55.025,4.95) ; v1(54.8,8.75) 55.3,8.75 55.35,8.775 56.75,10.175 56.775,10.175 v2(57.2,10.6) ; v1(59.525,17.9) 59.675,17.775 59.8,17.65 59.8,17.625 59.825,17.6 59.85,17.55 59.875,16.9 v2(59.875,15.55)
  L4-SIG w0.076: v1(23,5.575) v1(23.6,6.175) ; v4(33.7,2.325) 36.125,2.15 36.15,2.15 36.175,2.125 36.2,2.125 36.225,2.1 36.325,2.1 36.35,2.125 36.375,2.125 36.4,2.15 36.425,2.15 36.45,2.175 v4(38.5,2.15) ; v1@49.475,2.25 49.725,2.175 49.825,2.15 49.85,2.125 49.875,2.125 49.9,2.1 49.925,2.1 49.975,2.075 50,2.05 50.025,2.05 50.125,1.975 50.9,1.95 50.95,1.975 50.975,2 51,2 v1(51.55,2.475) ; v1@49.5,2.25 v1(49.5,2.275) ; v1(54.725,6.75) 54.6,8.725 v1(54.8,8.75) ; v1(59.525,17.9) 58.525,18.9 59.025,19.4 v6(59.8,19.75)
  other v3: 59.8,19.75
  other v5: 47.425,2.2 52.375,3.3 23.125,4.9 55.025,4.95 23.9,6.6 26.425,8.325 28.575,8.575 57.2,10.6 59.875,15.55
PUDC_B: R23.2 U1.E18 | length 17.5
  Top Layer w0.076: U1.E18@50.4,14.4 50.65,14.65 51.112,14.65 51.163,14.6 v2(51.25,14.6) ; v2(54.125,10.275) 55.3,10.275 55.475,10.1 56.75,10.1 56.825,10.025 56.825,9.175 v2(56.85,9.15)
  L3-SIG w0.076: v5@54.1,10.2 v1(54.1,11.15) ; v5@54.1,10.275 v2(54.125,10.275) ; v1(56.85,8.325) v2(56.85,9.15)
  L4-SIG w0.076: v2(51.25,14.6) 51.45,14.8 52.1,14.8 52.2,14.7 53.7,14.7 53.75,14.65 53.8,14.65 53.9,14.55 53.9,14.5 53.95,14.45 53.95,13.8 54.1,13.65 v1(54.1,11.15) ; v6(56.175,4.925) 56.4,6.125 56.4,7.45 56.85,7.9 v1(56.85,8.325)
  Bottom Layer w0.076: R23.2@55.45,4.05 v6(56.175,4.925)
  other v1: 51.25,14.6
  other v3: 56.175,4.925
  other v5: 56.85,9.15 54.125,10.275 51.25,14.6
PWR_CHRG: LD4.K U8.21 | length 20
  Top Layer w0.076: v2(7.925,7.475) 8.575,8.125 8.575,8.625 11.4,11.45 11.425,11.5 v2(12.275,12.425) ; v2(20.625,18.175) 22.275,18 LD4.K@22.65,17.725
  L3-SIG w0.076: v2(12.275,12.425) 13.3,13.45 13.3,14.225 v1(13.775,14.7) ; v1(19.425,18.15) v2(20.625,18.175)
  L4-SIG w0.076: v1(13.775,14.7) 16.15,17.075 16.175,17.075 16.2,17.1 16.375,17.1 16.45,17.175 16.475,17.175 16.525,17.225 16.55,17.225 16.6,17.275 16.625,17.275 16.7,17.35 16.725,17.35 16.775,17.4 16.8,17.4 16.85,17.45 16.875,17.45 16.95,17.525 16.975,17.525 17.025,17.575 17.05,17.575 17.1,17.625 17.125,17.625 17.175,17.675 17.2,17.675 17.225,17.7 17.325,17.7 17.35,17.725 17.475,17.725 17.5,17.75 17.625,17.75 17.65,17.775 17.775,17.775 17.8,17.8 17.925,17.8 17.95,17.825 18.075,17.825 18.1,17.85 18.225,17.85 18.25,17.875 18.375,17.875 18.4,17.9 18.525,17.9 18.55,17.925 18.675,17.925 18.7,17.95 18.825,17.95 18.85,17.975 18.975,17.975 19,18 19.125,18 19.15,18.025 19.275,18.025 19.3,18.05 v1(19.425,18.15)
  other v1: 7.925,7.475
  other v3: 7.925,7.475
  other v5: 7.925,7.475 12.275,12.425 20.625,18.175
  other v6: 7.925,7.475
PWR_CLPROG: C161.2 R103.1 U8.2 | length 6.5
  L4-SIG w0.076: v6(4.575,12) 6.55,10.85 v6(7.75,10.85)
  Bottom Layer w0.076: R103.1@4.575,12.7 4.575,12.8 4.8,13.025 4.8,13.95 4.7,14.05 4.7,15.35 C161.2@4.8,15.55
  other v3: 7.75,10.85 4.575,12
PWR_FB1: C168.2 L9.2 U8.6 | length 5.1
  L4-SIG w0.076: v6(6.9,14.25) 9.8,12.1 10.1,11.8 10.1,11.5 9.95,11.35 9.95,11.25 v6(9.925,11.225)
  Bottom Layer w0.076: L9.2@6.05,15.05 C168.2@6.05,15.5
  other v3: 9.925,11.225 6.9,14.25
PWR_FB2: C163.2 R113.2 R114.1 U8.17 | length 5.9
  L4-SIG w0.076: v6(7.575,6.375) 7.75,6.12 8.35,6.12 v6(8.625,6.5) 8.675,6.55 8.675,6.9 8.825,7.05 v6(9.75,7.05) ; v6(8.875,6.15) 8.875,5.225 v6(10.1,3.875)
  Bottom Layer w0.076: C163.2@8.7,6.35 v6(8.875,6.15)
  other v3: 10.1,3.875 8.875,6.15 7.575,6.375 8.625,6.5 9.75,7.05
PWR_FB3: C164.1 C165.2 C166.2 R115.2 R116.1 U8.7 | length 11.4
  L4-SIG w0.076: v6(4.475,13.35) 6.325,14.125 6.75,14.55 7.05,14.55 7.65,13.95 7.675,13.95 7.75,13.875 7.775,13.875 7.85,13.8 7.875,13.8 7.95,13.725 7.975,13.725 8.05,13.65 8.075,13.65 8.15,13.575 8.175,13.575 8.25,13.5 8.275,13.5 8.325,13.45 8.35,13.45 8.425,13.375 8.45,13.375 8.525,13.3 8.55,13.3 8.625,13.225 8.65,13.225 8.725,13.15 8.75,13.15 8.825,13.075 8.85,13.075 v6(9.475,13.05) ; v6(10.3,12.825) v6(10.35,11.125) ; v6(10.425,10.725) 11.425,10.25 12.075,9.625 12.375,9.325 v6(12.4,9.325)
  Bottom Layer w0.076: v6(9.475,13.05) R115.2@9.5,13.05 ; R115.2@9.7,12.85 C164.1@10.1,12.85 ; C164.1@10.3,13.025 10.65,13.375 C165.2@11.075,13.4
  other v3: 12.4,9.325 10.425,10.725 10.35,11.125 10.3,12.825 9.475,13.05 4.475,13.35
PWR_FB3_FF: C166.1 R118.2 | length 0.4
  Bottom Layer w0.076: C166.1@4,13.35 R118.2@4.25,13.675
PWR_PGOODALL: LD3.A R107.2 U8.15 | length 14.6
  Top Layer w0.076: v4(16.65,13.65) 17.4,14.4 17.4,15.2 18,15.8 LD3.A@21.05,15.8
  L4-SIG w0.076: v6(10.975,7.5) 11.05,7.525 11.7,8.175 12,8.175 12.325,7.85 13.1,7.85 13.15,7.875 13.275,8 13.3,8.05 13.3,8.15 13.475,8.325 13.475,8.35 13.5,8.375 15.025,10.2 v6(15.025,11.375)
  Bottom Layer w0.076: U8.15@10.925,7.475 v6(10.975,7.5) ; v6(15.025,11.375) R107.2@15.025,11.4 ; R107.2@15.725,11.95 v4(16.65,13.65)
  other v3: 10.975,7.5 15.025,11.375
PWR_PROG: R102.1 U8.20 | length 2.6
  Bottom Layer w0.076: R102.1@6.85,5.325 7.05,5.775 7.075,5.8 7.075,5.825 7.15,5.9 7.975,5.9 8.3,6.225 U8.20@8.3,6.925
PWR_SW: L8.1 U8.26 | length 2
  L4-SIG w0.3: v6(6.125,9.3) v6(6.575,9.3)
  Bottom Layer w0.4: L8.1@5.35,10.65 5.775,9.7 v6(6.125,9.3)
  other v3: 6.125,9.3 6.575,9.3
PWR_SW1: L9.1 U8.4 | length 2.4
  L4-SIG w0.25: v6(6.9,12.1) 7.65,12.1 7.675,12.075 7.7,12.075 7.725,12.05 7.75,12.05 7.9,11.9 7.9,11.875 7.925,11.85 7.925,11.825 7.95,11.8 7.95,11.6 8.275,11.275 8.3,11.275 8.325,11.25 v6(8.75,11.2)
  other v3: 8.75,11.2 6.9,12.1
PWR_SW2: L2.1 U8.19 | length 1.1
  L4-SIG w0.25: v6(8.975,6.75) v6(9.3,6.425)
  Bottom Layer w0.3: U8.19@8.925,6.925 8.95,6.8 8.975,6.775 v6(8.975,6.75) ; v6(9.3,6.425) L2.1@9.65,6.2
  other v3: 9.3,6.425 8.975,6.75
PWR_SWAB3: L1.1 U8.9 | length 1.6
  Bottom Layer w0.4: U8.9@11.775,10.3 12.175,10.3 12.25,10.225 L1.1@13.375,10.175
PWR_SWCD3: L1.2 U8.14 | length 1.9
  L4-SIG w0.3: v6(11.85,7.875) v6(12.6,7.125)
  Bottom Layer w0.4: U8.14@11.775,7.875 v6(11.85,7.875) ; v6(12.6,7.125) L1.2@13.375,7.125
  other v3: 12.6,7.125 11.85,7.875
PWR_VC3: C164.2 R117.1 U8.8 | length 1.9
  L4-SIG w0.076: v6(10.75,11.275) v6(10.75,12.825)
  Bottom Layer w0.076: C164.2@10.9,12.825 R117.1@11.2,12.825
  other v3: 10.75,11.275 10.75,12.825
PWR_VC3_RC: C165.1 R117.2 | length 0.4
  Bottom Layer w0.076: R117.2@11.8,13 C165.1@11.8,13.4
RAS#: U1.V3 U3.18 | length 21
  Top Layer w0.076: v4(39.15,4.4) 42.325,6.225 42.65,6.55 42.65,7.187 42.65,7.65 U1.V3@42.9,7.9
  L3-SIG w0.125: v6(25.55,6.975) 25.55,6.75 26.95,5.35 38.6,4.75 v4(39.15,4.4)
  Bottom Layer w0.125: U3.18@25.15,6.17 v6(25.55,6.975)
  other v1: 25.55,6.975
  other v3: 25.55,6.975
RST#: R1.2 R4.16 U1.V10 X2.23 | length 29.3
  Top Layer w0.076: v2(46.1,6.1) 46.15,7.475 U1.V10@46.4,7.9 ; v2(51.2,1.9) 51.8,2.2 52.8,2.1 X2.23@54.61,1.27 ; v2(58.35,13.95) 58.45,14.05 R4.16@58.45,15.378
  L3-SIG w0.076: v2(46.1,6.1) 46,5.4 v1(47,4.3) ; v1(47.3,3.5) 47.6,3.1 47.7,3 49.6,3 50.7,1.9 v2(51.2,1.9) ; v1(58.35,10.95) 58.65,10.65 58.65,7.9 58.8,7.75 58.8,5.4 v1(58.65,5.25)
  L4-SIG w0.076: v1(47,4.3) 47,3.8 v1(47.3,3.5) ; v1(58.35,10.95) v2(58.35,13.95)
  Bottom Layer w0.076: X2.23@55.15,1.55 57.4,3.65 57.5,3.75 57.625,3.75 57.65,3.775 58.1,3.975 R1.2@58.6,4.55 ; R1.2@58.6,4.85 R1.2@58.6,4.55 ; v1(58.65,5.25) 58.65,4.6 R1.2@58.6,4.55
  other v1: 58.35,13.95
  other v3: 58.65,5.25
  other v5: 51.2,1.9 46.1,6.1 58.35,13.95
  other v6: 58.65,5.25
SD-CLK: U1.U8 X3.5 | length 36.5
  Top Layer w0.076: X3.5@14.825,11 v2(16.275,10.775) ; U1.U8@45.4,8.4 v4(45.4,8.9)
  L3-SIG w0.076: v2(16.275,10.775) v1(16.625,10.45) ; v1(17.425,11.3) 17.45,11.3 17.65,11.5 20.65,11.5 v1(21.35,12.2)
  L4-SIG w0.076: v1(16.625,10.45) v1(17.425,11.3) ; v1(21.35,12.2) 25.15,12.15 v6(25.3,12.3) ; v6(31.5,13) 34.85,12.35 38.55,12.35 39.25,11.65 39.25,11 40.75,11 v6(41.6,11.85)
  Bottom Layer w0.076: v6(25.3,12.3) 25.8,12.1 26.55,12.1 26.9,12.45 v6(31.5,13) ; v6(41.6,11.85) 42.45,11.85 43.05,11.25 43.05,8.8 43.25,8.6 44.95,8.55 v4(45.4,8.9)
  other v3: 41.6,11.85 25.3,12.3 31.5,13
  other v5: 16.275,10.775
SD-CMD: R35.1 U1.U7 X3.3 | length 63
  Top Layer w0.076: v2(13,13.6) 13.125,13.475 X3.3@14.15,13.475 14.475,13.475 v2(15.8,12.15) ; v2(37.2,4.5) 38.8,6.1 39.85,6.1 v2(40.25,6.5) ; U1.U7@44.9,8.4 v4(44.9,8.9)
  L3-SIG w0.076: v4(10.1,20.55) 10.1,18.95 13,16.05 v2(13,13.6) ; v2(15.8,12.15) 15.8,11.7 17.5,10 17.5,4.25 18.15,3.6 18.15,0.9 18.7,0.35 32.95,0.35 v1(33.8,1.2) ; v1(36.65,3.95) v2(37.2,4.5) ; v2(40.25,6.5) 40.35,6.6 v1(40.85,6.6)
  L4-SIG w0.076: v1(40.85,6.6) 40.9,6.55 41.5,6.55 41.6,6.65 v6(42.25,6.65) ; v6(43.15,6.15) 45.7,6.15 45.75,6.1 45.95,6.1 v6(46.4,6.55)
  Bottom Layer w0.076: R35.1@9.25,21.39 v4(10.1,20.55) ; v1(33.8,1.2) 35.8,1.2 35.932,1.332 35.95,1.72 36.327,2.097 36.65,2.152 v1(36.65,3.95) ; v6(42.25,6.65) 42.45,6.45 42.85,6.45 v6(43.15,6.15) ; v4(44.9,8.9) 45.225,9.225 45.625,9.225 46.4,8.45 46.7,8.45 46.9,8.25 46.9,7.1 47,7 47,6.8 46.75,6.55 v6(46.4,6.55)
  other v3: 33.8,1.2 36.65,3.95 43.15,6.15 46.4,6.55 42.25,6.65
  other v5: 37.2,4.5 40.25,6.5 15.8,12.15 13,13.6
  other v6: 33.8,1.2 36.65,3.95
SD-DAT0: R34.1 U1.C15 X3.7 | length 66.4
  Top Layer w0.076: v2(13.1,10.7) 13.1,9.8 13.825,9.075 X3.7@14.15,9.075 14.675,9.6 v2(15.2,9.6) ; v4(48.4,14.9) U1.C15@48.9,15.4
  L3-SIG w0.076: v1(11.05,16) 11.95,15.1 11.95,12.15 13.1,11 v2(13.1,10.7) ; v1(18.1,14.3) 18.1,14.75 v5(19.45,16.1) ; v1(42.35,18.2) v1(42.8,18.65) ; v1(44.45,18.9) 44.7,18.65 45.225,18.65 48.5,15.375 48.6,15.375 48.675,15.3 49.075,15.3 49.225,15.15 49.225,14.775 49.025,14.575 48.725,14.575 v4(48.4,14.9)
  L4-SIG w0.076: v2(15.2,9.6) 18.1,12.5 v1(18.1,14.3) ; v5(19.45,16.1) v6(20.45,15.675) ; v6(21.25,15.675) 21.25,16 20.775,16.475 20.775,16.5 20.75,16.525 20.75,16.725 20.775,16.75 20.775,16.775 20.95,16.95 20.975,16.95 21,16.975 21.725,17 21.75,16.975 21.775,16.975 21.95,16.8 v4(22.55,16.55) ; v6(29.5,18.7) 30,19.2 35.75,19.2 36.3,18.65 37.15,18.65 37.75,18.05 42.2,18.05 v1(42.35,18.2) ; v1(42.8,18.65) 43.2,18.65 43.45,18.9 v1(44.45,18.9)
  Bottom Layer w0.076: R34.1@10.825,19.85 10.125,18.325 10.125,17.9 10.875,17.15 11,16.05 v1(11.05,16) ; R34.1@11,19.81 10.62,20.19 R34.1@11.02,20.19 ; v6(20.45,15.675) v6(21.25,15.675) ; v4(22.55,16.55) 22.925,16.125 23.2,15.85 23.5,15.85 24.425,16.775 24.65,16.775 24.725,16.85 ; v3(23.85,18.4) 23.95,18.3 24.725,18.3 24.725,16.85 ; v6(29.5,18.7) 29.5,18.65 29.15,18.3 28.775,18.3 28.775,16.85 28.9,16.725 28.9,16.35 28.75,16.2 28.575,16.2 28.55,16.175 28.525,16.175 27.55,15.2 27.25,15.2 27.175,15.275 26.7,15.275 25.475,16.5 25.075,16.5 24.725,16.85
  other v1: 15.2,9.6 19.45,16.1
  other v3: 20.45,15.675 21.25,15.675 11.05,16 29.5,18.7
  other v5: 15.2,9.6 13.1,10.7
  other v6: 11.05,16